# EAGLE board Melting Point Panel (EAGLE 9.7.0)
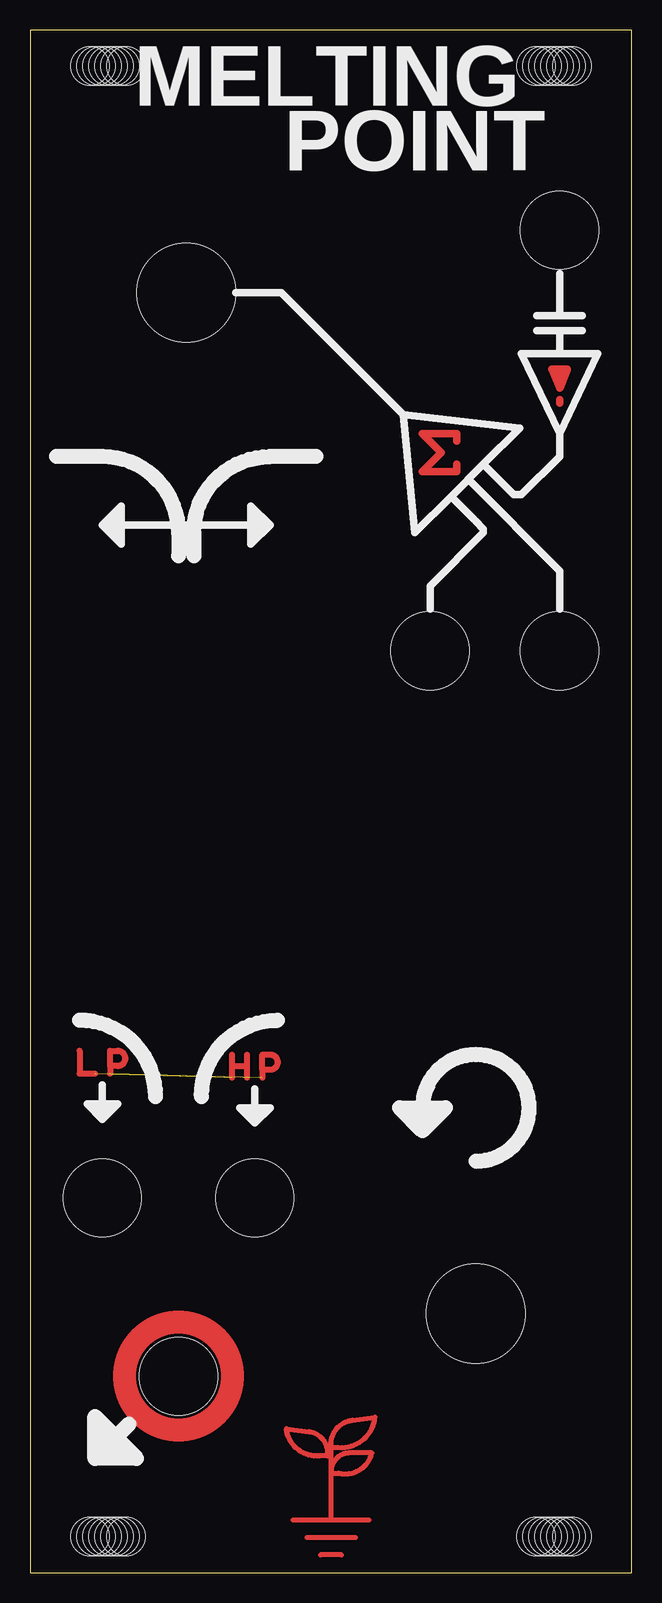
[diagram p0: board, top side]
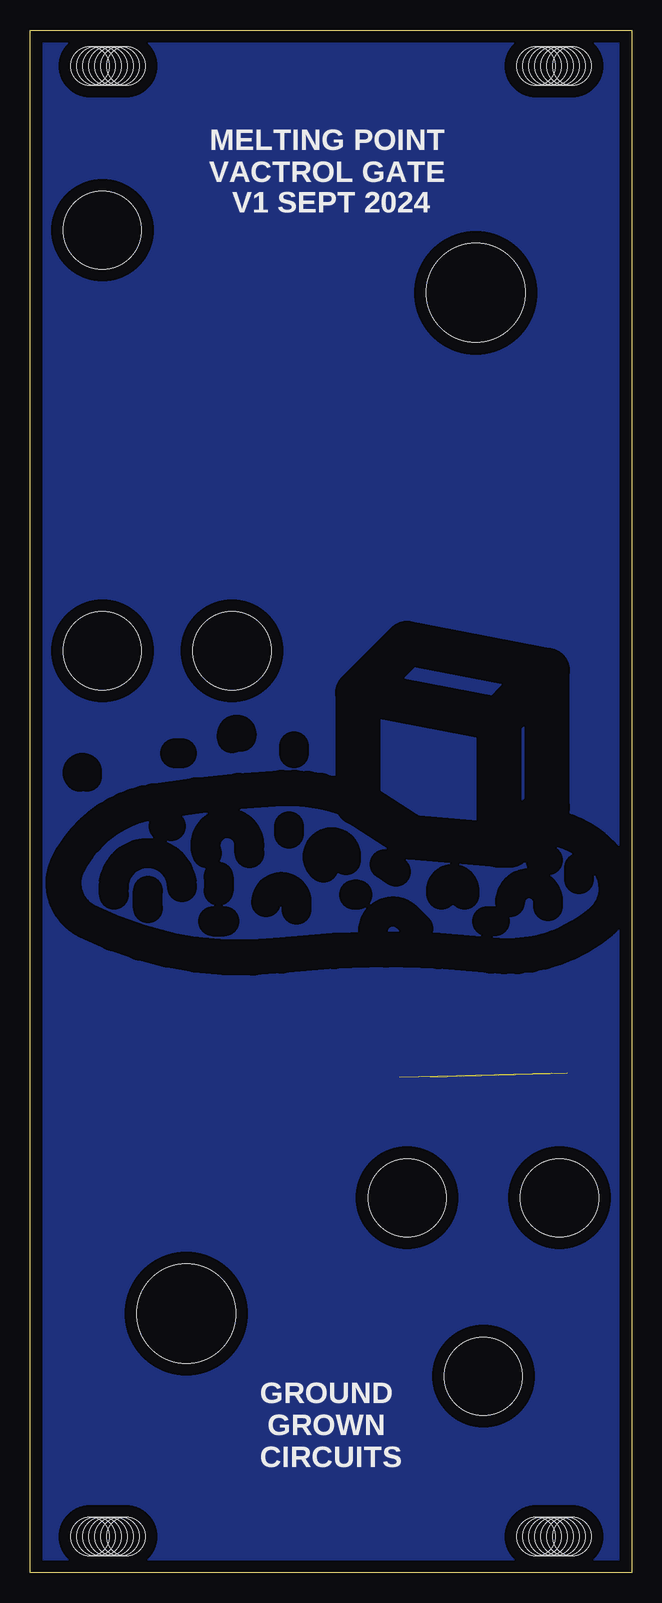
[diagram p1: board, bottom side, seen from below]

Size 50.16 x 128.59 mm. Coordinates in mm from the lower left corner, seen from the top.
Outline: 0,0 50.16,0 50.16,128.59 0,128.59 0,0
Copper layers (1*16): Top 0.035mm / dielectric 1.5mm / Bottom 0.035mm
Design rules "Fusion Electronics Design Rules": minimum track width 6mil, minimum drill 0.35mm, track to track 6mil, track to pad 6mil, pad to pad 6mil, via to via 6mil, smd to smd 6mil, copper to edge 40mil, drill to drill 6mil, minimum pad ring 10mil, minimum via ring 8mil, stop-mask expansion 4mil, vias tented up to drill 0mil, thermal gap 10mil
bRestrict: 51 lines

## Footprints (pad centres in the part's own frame; a part is rotated, then mirrored left to right if it is on the bottom)
JACK_DRILL = hole 6.5: 0,0
JACK_DRILL_COPPER = hole 6.5: 0,0
POT_DRILL = hole 8.25: 0,0
MOUNT_DRILL = hole 3.2: 3,8; 3,7.5; 3,7; 3,6.5; 3,6; 3,5.5; 3,5

## Placement (x,y rotation side)
E$1  [JACK_DRILL]  6.03,31.24 0 top
E$2  [JACK_DRILL]  18.73,31.24 0 top
E$3  [JACK_DRILL_COPPER]  12.38,16.37 0 top
E$4  [POT_DRILL]  37.15,21.59 0 top
E$5  [POT_DRILL]  13.02,106.68 0 top
E$6  [JACK_DRILL]  33.34,76.83 0 top
E$7  [JACK_DRILL]  44.13,76.83 0 top
E$8  [JACK_DRILL]  44.13,111.9 0 top
E$9  [MOUNT_DRILL]  50.16,0 90 top
E$10  [MOUNT_DRILL]  0,0 90 bottom
E$11  [MOUNT_DRILL]  0,128.59 270 top
E$12  [MOUNT_DRILL]  50.16,128.59 270 bottom
E$16  [LOGO_MED_COPPER]  25.08,4.45 0 top

## Library data of the parts
E$1-E$12 E$16 = Edge Connectors

## Tracks (layer width: path | path; a pad name or v marks a point on that pad's centre or on a via)
S$1
  pour Bottom (isolate 0.61): 0.06,0.06 50.1,0.06 50.1,128.52 0.06,128.52
S$2
  Top 0.61: 35.56,94.3 35.56,94.93 32.7,94.93 34.29,93.34 32.7,91.76 35.56,91.76 35.56,92.39
S$3
  Top 0.61: 43.5,100.33 44.77,100.33 44.13,98.74 43.5,100.33 | 43.5,100.33 44.32,99.93 44.13,99.54
S$4
  Top 0.61: 44.13,97.79 44.13,97.47
S$5  (1 unrouted)
  Top 0.508: 4.13,43.5 4.13,41.59 5.4,41.59 | 16.83,43.18 16.83,42.23 | 16.83,42.23 16.83,41.27 | 18.1,41.27 18.1,42.23 | 18.1,42.23 18.1,43.18 | 16.83,42.23 18.1,42.23
S$6  (1 unrouted)
  Top 0.508: 6.67,42.23 6.67,41.59 | 6.67,42.23 6.67,43.5 7.3,43.5 arc-90 7.94,42.86 arc-90 7.3,42.23 6.67,42.23 | 19.37,41.91 19.37,41.27 | 19.37,41.91 19.37,43.18 20,43.18 arc-90 20.64,42.55 arc-90 20,41.91 19.37,41.91

## Text on the board
tPlace: MELTING | POINT
bPlace: MELTING POINT / VACTROL GATE | V1 SEPT 2024 | GROUND / GROWN / CIRCUITS